# Altium PCB PlanesQfn.PcbDoc
Units mm, origin at the board's own origin, x right, y up, seen from the top; angles counter-clockwise.
Board outline 30 x 30 mm, 4 copper layers (Top Layer, Mid-Layer 1, GND Plane, Bottom Layer), stack 0 mm thick; 1 components, 26 nets, 33 pads, 129 vias.
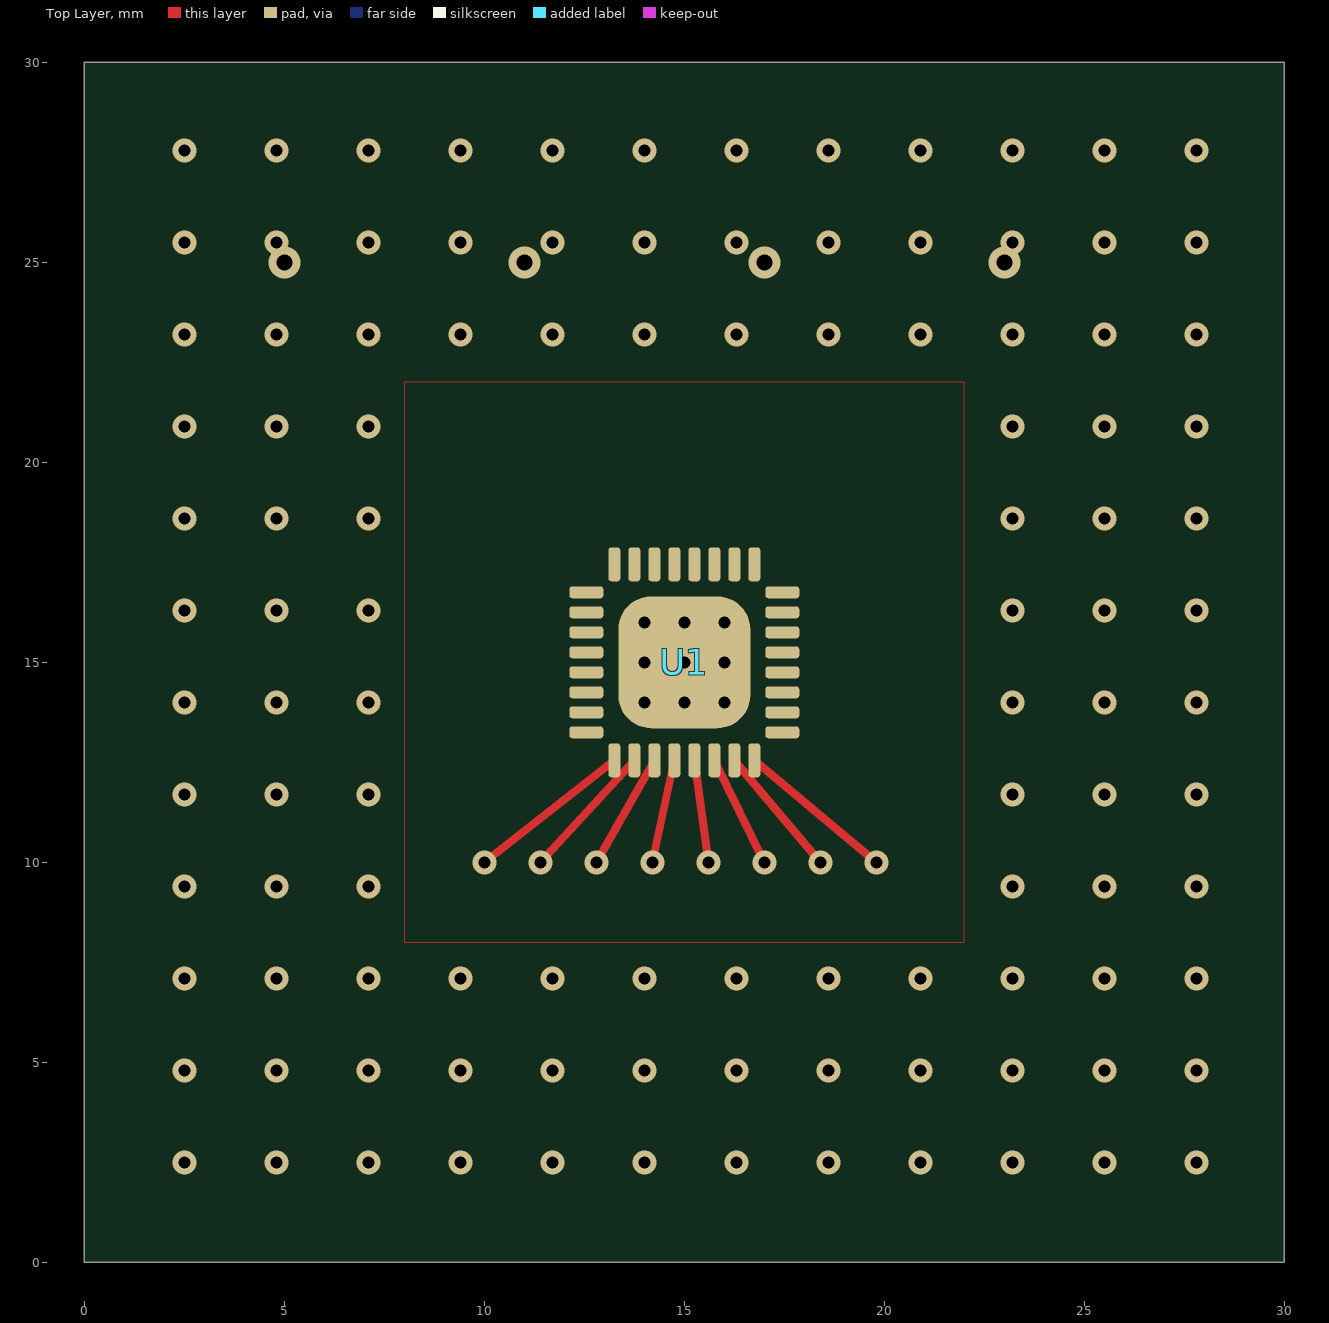
[diagram p0: Top Layer view]
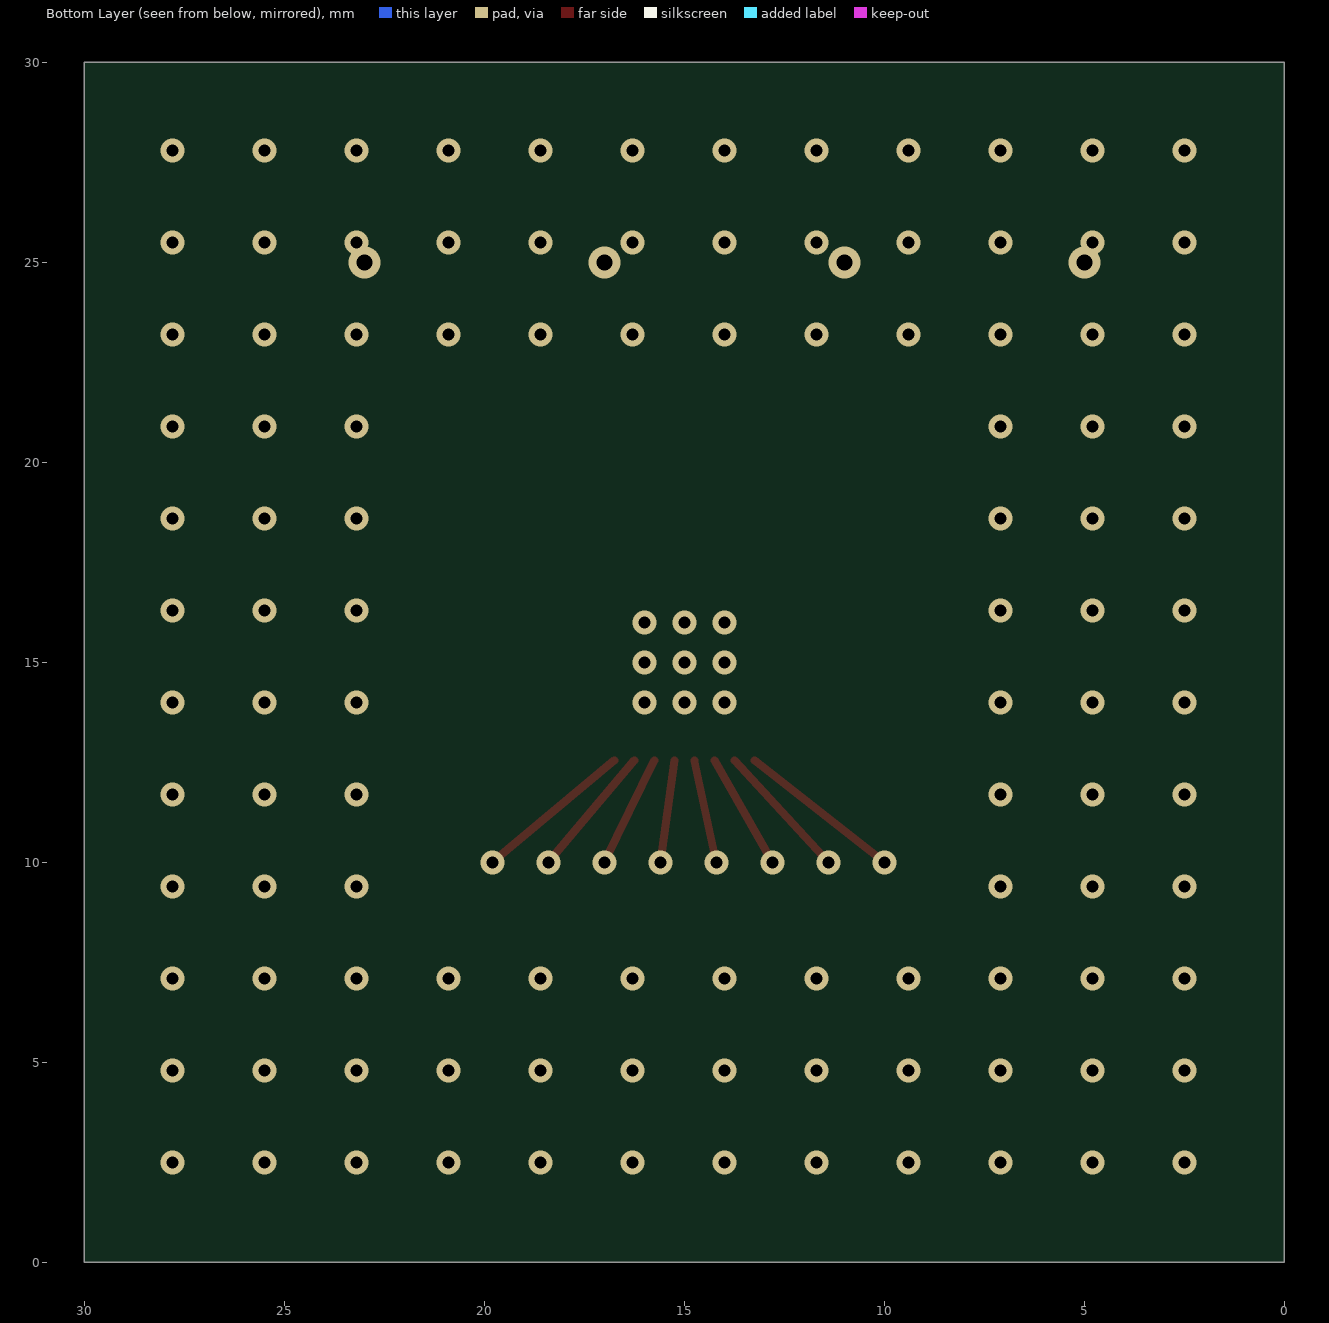
[diagram p1: Bottom Layer view, seen from below]
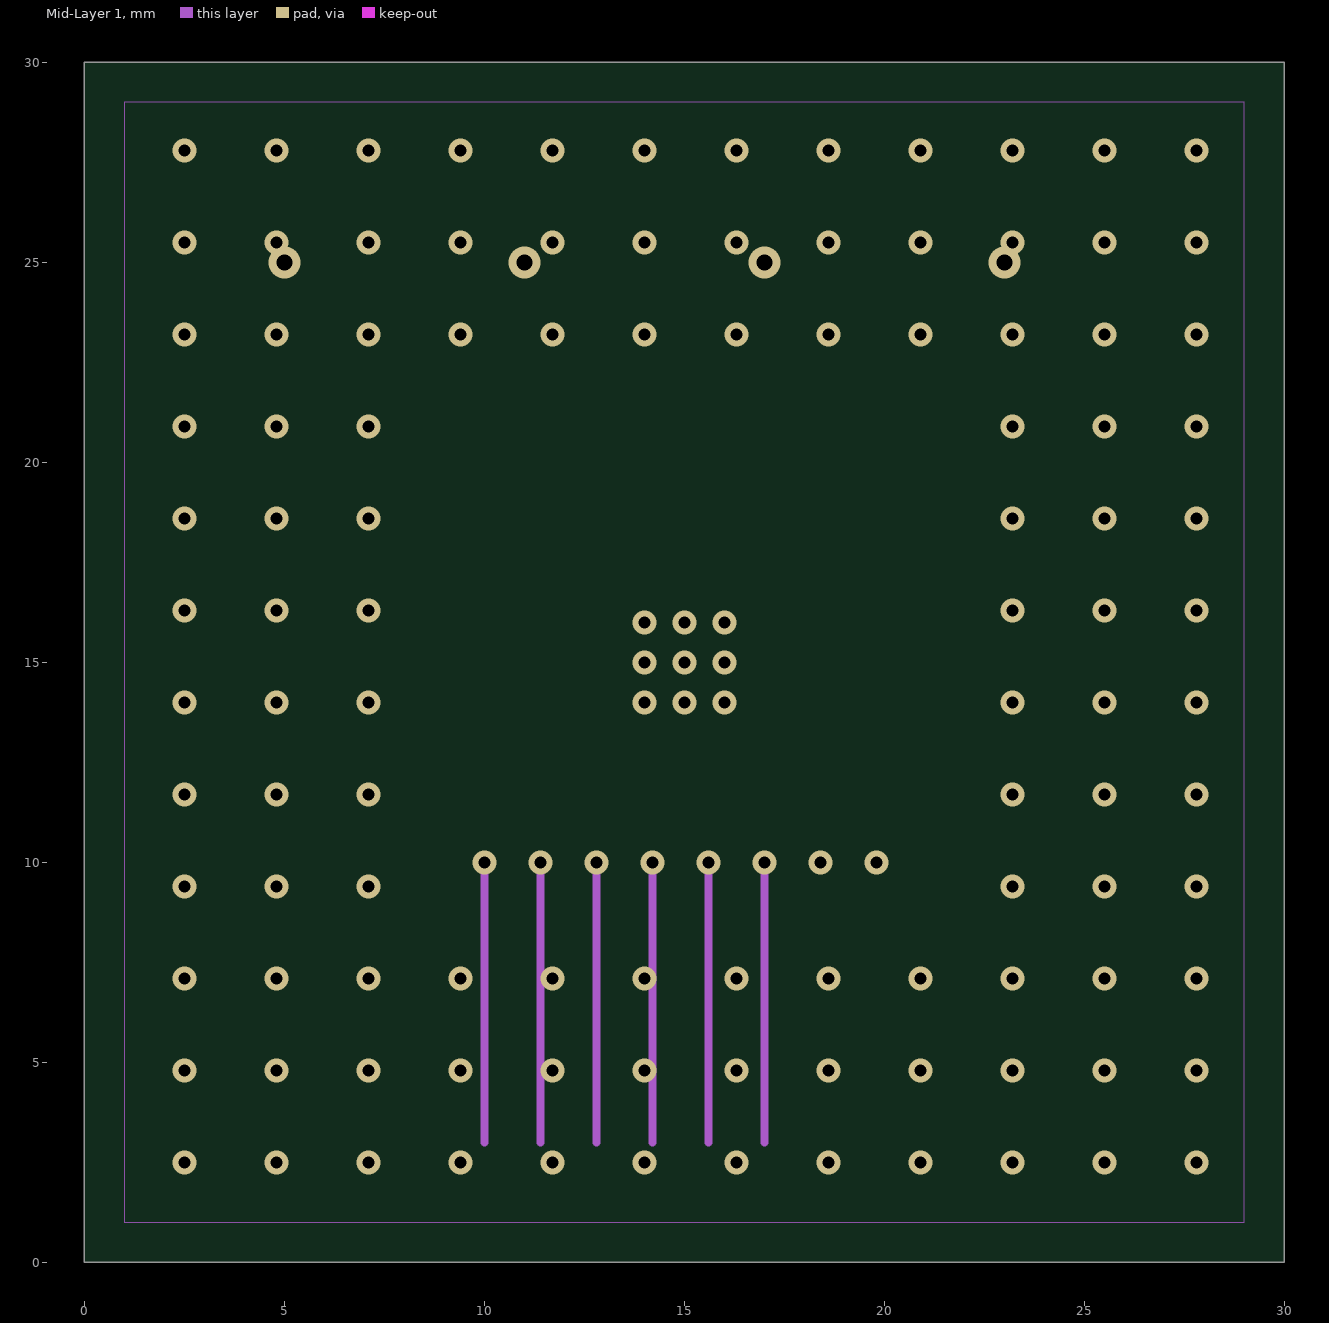
[diagram p2: Mid-Layer 1]
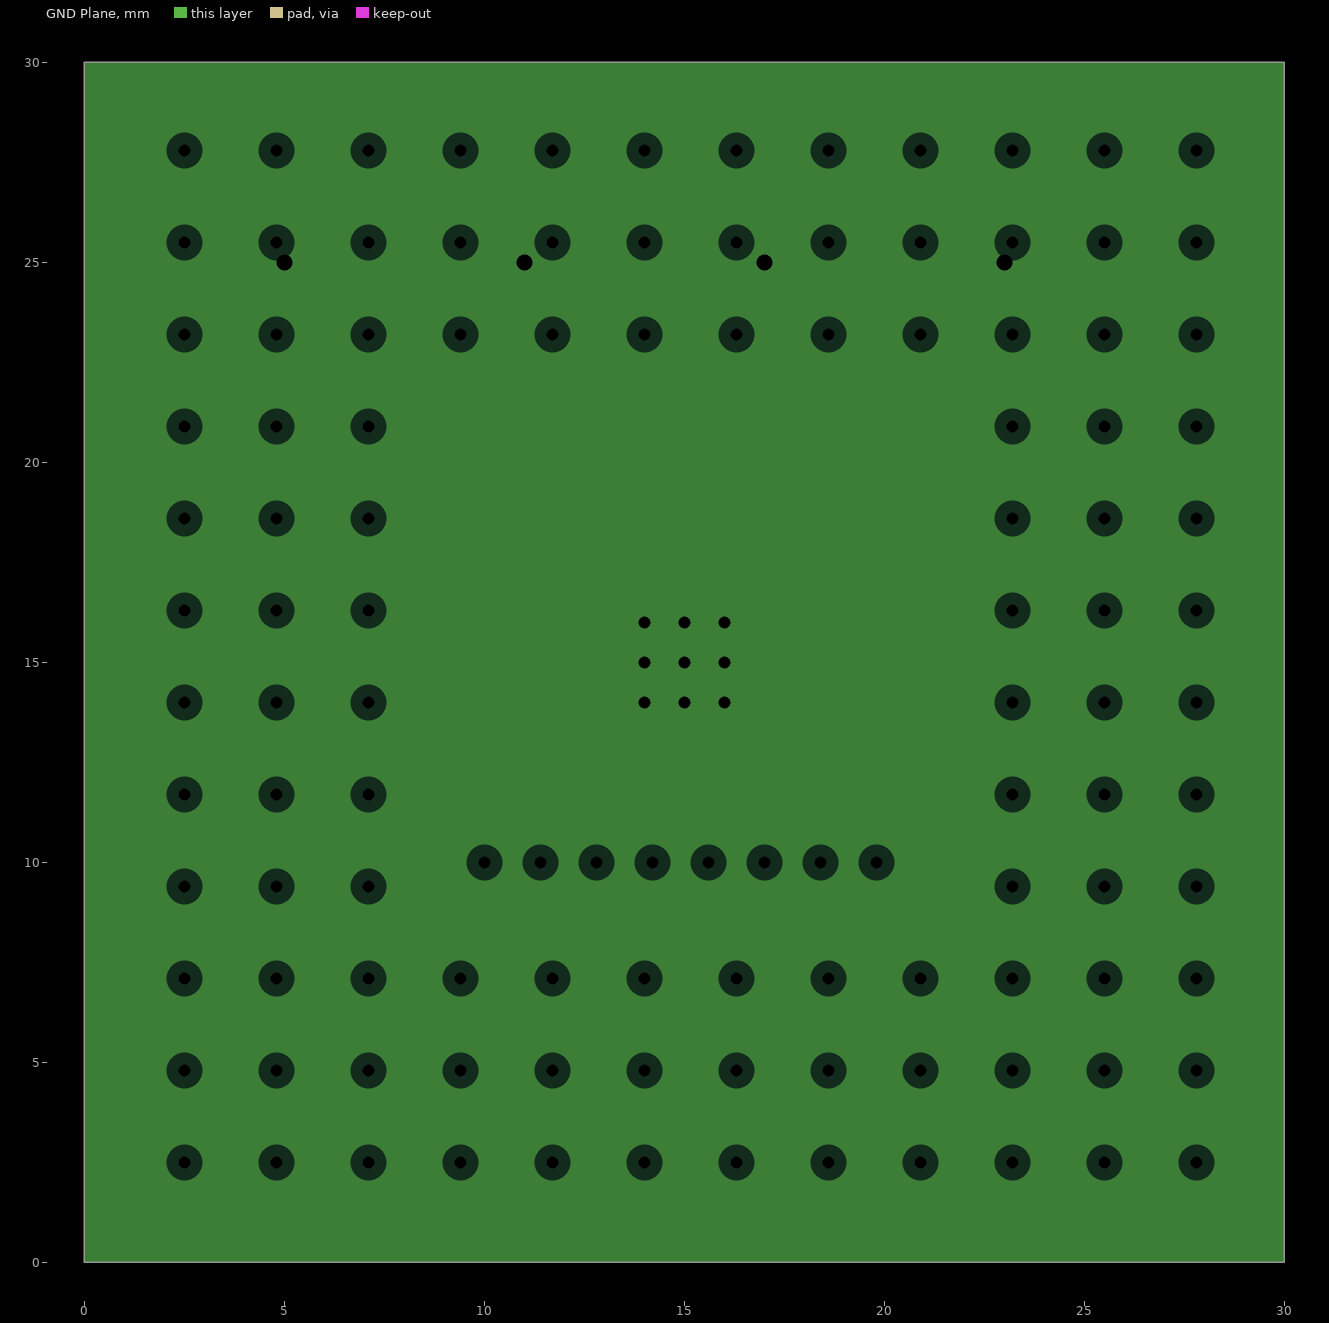
[diagram p3: GND Plane, clearances drawn from the general rule]

## Layer stack, top to bottom
Top Layer: signal copper (thickness not stored)
Mid-Layer 1: signal copper (thickness not stored)
GND Plane: plane copper (thickness not stored)
Bottom Layer: signal copper (thickness not stored)

## Board outline
0,0 30,0 30,30 0,30

## Design rules (kind name [scope] priority, off if disabled: settings)
PlaneClearance "" [All] p1: clearance=0.3
PlaneConnect "" [All] p1: via.planeconnectstyle=Direct pad.planeconnectstyle=Relief pad.reliefexpansion=0.25 pad.reliefairgap=0.25 pad.reliefconductorwidth=0.25 pad.reliefentries=4

## Components (designator, comment, footprint, x,y, rotation, side; value= is the part's Value field where it differs from the comment)
U1 "" QFN32_5X5 15,15 r0 top

## Footprints (in the part's own frame and the unit in brackets; to place one, negate y for a bottom-side part, rotate by r counter-clockwise, add the part's x,y. Pads: shape width x height; smd on the part's side, far side on the other; paste and mask are expansions set on the pad)
QFN32_5X5 [mm]
  rrect50% 0.85x0.3 smd: 1(-2.45,1.75) 2(-2.45,1.25) 3(-2.45,0.75) 4(-2.45,0.25) 5(-2.45,-0.25) 6(-2.45,-0.75) 7(-2.45,-1.25) 8(-2.45,-1.75) 17(2.45,-1.75) 18(2.45,-1.25) 19(2.45,-0.75) 20(2.45,-0.25) 21(2.45,0.25) 22(2.45,0.75) 23(2.45,1.25) 24(2.45,1.75)
  rrect50% 0.3x0.85 smd: 9(-1.75,-2.45) 10(-1.25,-2.45) 11(-0.75,-2.45) 12(-0.25,-2.45) 13(0.25,-2.45) 14(0.75,-2.45) 15(1.25,-2.45) 16(1.75,-2.45) 25(1.75,2.45) 26(1.25,2.45) 27(0.75,2.45) 28(0.25,2.45) 29(-0.25,2.45) 30(-0.75,2.45) 31(-1.25,2.45) 32(-1.75,2.45)
  rrect50% 3.3x3.3 smd: 33(0,0)

## Via types
v1: diameter 0.6, hole 0.3, Top Layer to Bottom Layer, 125 vias
v2: diameter 0.8, hole 0.4, Top Layer to Bottom Layer, 4 vias

## Nets (pads, with @x,y where several pads share a name; then routed paths per layer and width w, separated by ;. In a path a pad name is that pad's centre, name@x,y a point inside that pad or via, vN(x,y) a via of type N, cw(c..) or ccw(c..) an arc to the next point about the centre after c; other vN are vias at no path point)
3V3: 
GND: U1.2 U1.6 U1.16 U1.20 U1.21 U1.28 U1.29 U1.30 U1.31 U1.33
  other v1: 14,14 15,14 16,14 14,15 15,15 16,15 14,16 15,16 16,16
  other v2: 5,25 11,25 17,25 23,25
SIG0: U1.1 | length 11.1
  Top Layer w0.2: v1(10,10) 13.25,12.55
  Mid-Layer 1 w0.2: 10,3 v1(10,10)
  other v1: 2.5,2.5
SIG1: U1.9 | length 10.5
  Top Layer w0.2: v1(11.4,10) 13.75,12.55
  Mid-Layer 1 w0.2: 11.4,3 v1(11.4,10)
  other v1: 4.8,2.5 2.5,4.8
SIG2: U1.17 | length 9.9
  Top Layer w0.2: v1(12.8,10) 14.25,12.55
  Mid-Layer 1 w0.2: 12.8,3 v1(12.8,10)
  other v1: 7.1,2.5 4.8,4.8 2.5,7.1
SIG3: U1.25 | length 9.6
  Top Layer w0.2: v1(14.2,10) 14.75,12.55
  Mid-Layer 1 w0.2: 14.2,3 v1(14.2,10)
  other v1: 9.4,2.5 7.1,4.8 4.8,7.1 2.5,9.4
SIG4: U1.10 | length 9.6
  Top Layer w0.2: 15.25,12.55 v1(15.6,10)
  Mid-Layer 1 w0.2: 15.6,3 v1(15.6,10)
  other v1: 11.7,2.5 9.4,4.8 7.1,7.1 4.8,9.4 2.5,11.7
SIG5: U1.18 | length 9.8
  Top Layer w0.2: 15.75,12.55 v1(17,10)
  Mid-Layer 1 w0.2: 17,3 v1(17,10)
  other v1: 14,2.5 11.7,4.8 9.4,7.1 7.1,9.4 4.8,11.7 2.5,14
SIG6: U1.26 | length 3.3
  Top Layer w0.2: 16.25,12.55 v1(18.4,10)
  other v1: 16.3,2.5 14,4.8 11.7,7.1 7.1,11.7 4.8,14 2.5,16.3
SIG7: U1.3 | length 4
  Top Layer w0.2: 16.75,12.55 v1(19.8,10)
  other v1: 18.6,2.5 16.3,4.8 14,7.1 7.1,14 4.8,16.3 2.5,18.6
SIG8: U1.11
  other v1: 20.9,2.5 18.6,4.8 16.3,7.1 7.1,16.3 4.8,18.6 2.5,20.9
SIG9: U1.19
  other v1: 23.2,2.5 20.9,4.8 18.6,7.1 7.1,18.6 4.8,20.9 2.5,23.2
SIG10: U1.27
  other v1: 25.5,2.5 23.2,4.8 20.9,7.1 7.1,20.9 4.8,23.2 2.5,25.5
SIG11: U1.4
  other v1: 27.8,2.5 25.5,4.8 23.2,7.1 7.1,23.2 4.8,25.5 2.5,27.8
SIG12: U1.12
  other v1: 27.8,4.8 25.5,7.1 23.2,9.4 9.4,23.2 7.1,25.5 4.8,27.8
SIG13: U1.5
  other v1: 27.8,7.1 25.5,9.4 23.2,11.7 11.7,23.2 9.4,25.5 7.1,27.8
SIG14: U1.13
  other v1: 27.8,9.4 25.5,11.7 23.2,14 14,23.2 11.7,25.5 9.4,27.8
SIG15: U1.14
  other v1: 27.8,11.7 25.5,14 23.2,16.3 16.3,23.2 14,25.5 11.7,27.8
SIG16: U1.22
  other v1: 27.8,14 25.5,16.3 23.2,18.6 18.6,23.2 16.3,25.5 14,27.8
SIG17: U1.7
  other v1: 27.8,16.3 25.5,18.6 23.2,20.9 20.9,23.2 18.6,25.5 16.3,27.8
SIG18: U1.15
  other v1: 27.8,18.6 25.5,20.9 23.2,23.2 20.9,25.5 18.6,27.8
SIG19: U1.23
  other v1: 27.8,20.9 25.5,23.2 23.2,25.5 20.9,27.8
SIG20: U1.8
  other v1: 27.8,23.2 25.5,25.5 23.2,27.8
SIG21: U1.24
  other v1: 27.8,25.5 25.5,27.8
SIG22: U1.32
  other v1: 27.8,27.8
SIG23: 

## Polygon pours and split planes (outlines as drawn)
GND on Mid-Layer 1 "MidGND" (solid, pour order 0): 1,1 29,1 29,29 1,29
GND on GND Plane (split plane): 0.5,0.5 29.5,0.5 29.5,29.5 0.5,29.5
GND on Top Layer "TopGND" (solid, pour order 1): 8,8 22,8 22,22 8,22